# Altium PCB STM32 ONBOARD.PcbDoc (part 2 of 2)
Units mm, origin at the board's own origin, x right, y up, seen from the top; angles counter-clockwise.
Board outline 80.78 x 83.12 mm, 2 copper layers (Top Layer, Bottom Layer); 65 components, 57 nets, 280 pads, 99 vias.
Unrouted connection lines stored in the file: 49.
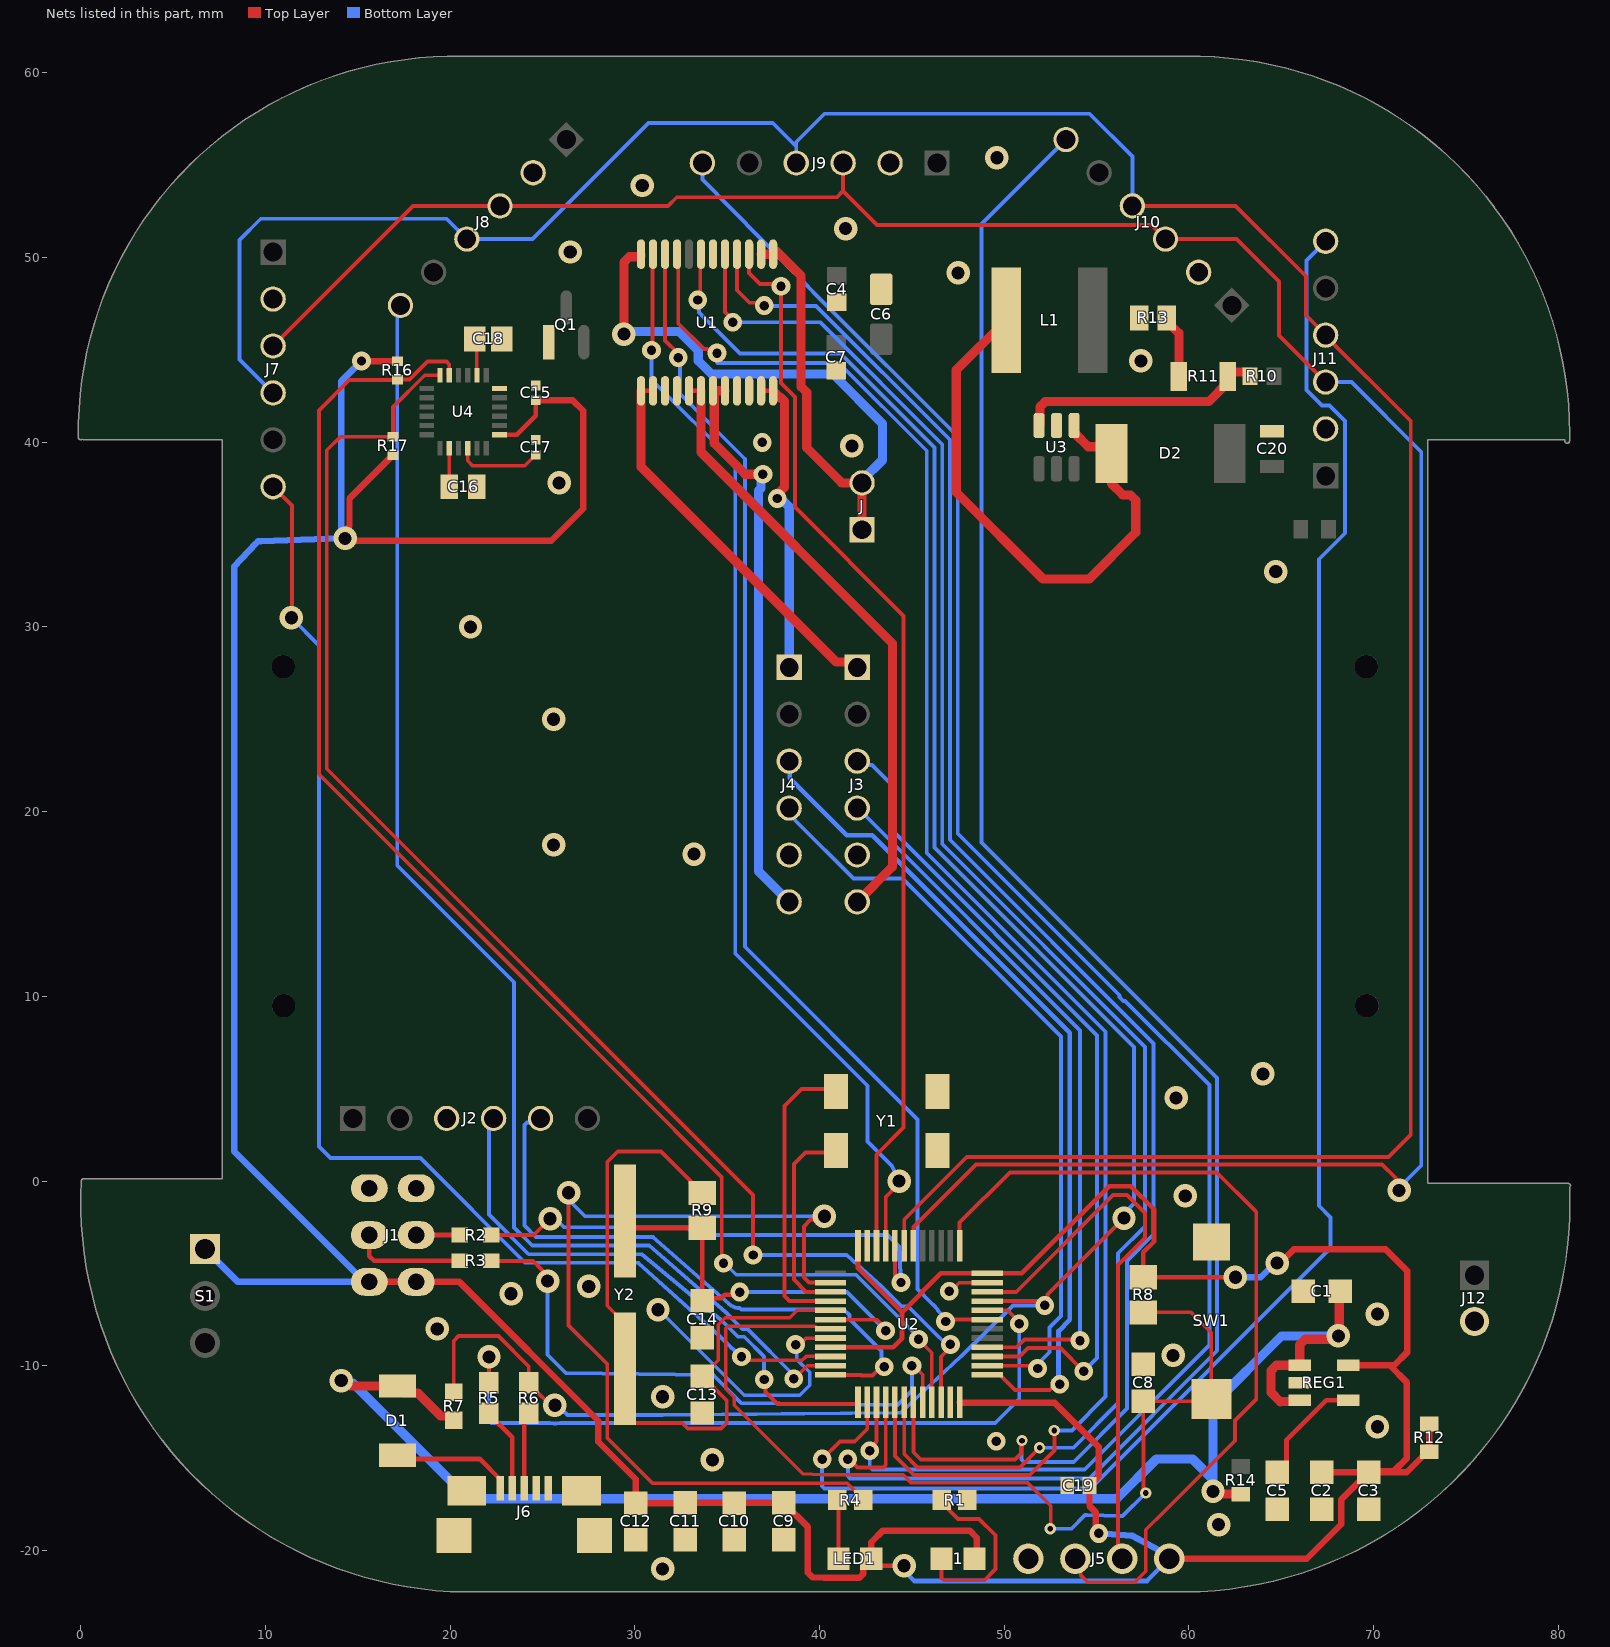
[diagram p2: the nets of this part, all layers, seen from the top]

## Via types
v1: diameter 1.27, hole 0.711, Top Layer to Bottom Layer, 57 vias
v2: diameter 1.016, hole 0.508, Top Layer to Bottom Layer, 37 vias
v3: diameter 0.61, hole 0.305, Top Layer to Bottom Layer, 5 vias

## Nets (pads, with @x,y where several pads share a name; then routed paths per layer and width w, separated by ;. In a path a pad name is that pad's centre, name@x,y a point inside that pad or via, vN(x,y) a via of type N, cw(c..) or ccw(c..) an arc to the next point about the centre after c; other vN are vias at no path point) (continued)
5V: C1.1 D1.K R7.1 R14.1 REG1.1 REG1.3 | length 82.6
  Top Layer w0.5: v1@14.603,-11.095 D1.K@17.145,-11.095 17.52,-11.47 18.246,-11.47 19.493,-12.717 19.968,-12.717 R7.1@20.193,-12.942 ; v1(61.3,-16.8) 61.442,-16.942 62.792,-16.942 R14.1@62.8,-16.95 ; REG1.3@65.94,-11.929 64.959,-11.929 64.943,-11.945 64.438,-11.44 64.438,-10.262 64.731,-9.969 REG1.1@66,-9.969 66,-8.859 66.293,-8.566 67.694,-8.566 67.879,-8.382 v1(68.087,-8.382) 68.135,-8.334 68.135,-6.017 C1.1@68.183,-5.969
  Bottom Layer w0.5: v1(14.1,-10.8) 14.247,-10.947 14.736,-10.947 20.989,-17.2 56.089,-17.2 58.239,-15.05 60.186,-15.05 61.3,-16.164 ; v1(61.3,-16.8) 61.3,-16.164 ; v1(68.087,-8.382) 65.018,-8.382 61.3,-12.1 61.3,-16.164
+3V3: 1.A C2.1 C3.1 C9.1 C10.1 C11.1 C12.1 C15.1 C19.1 J1.1 J1.2 J5.1 LED1.A R8.2 R12.1 R12.2 R16.2 R17.2 REG1.5 S1.1 U2.9 U2.24 U2.36 U2.48 U4.13 | length 264.5
  Top Layer w0.254: U4.13@22.671,40.406 23.602,40.406 24.638,41.442 C15.1@24.638,42.272 ; U2.9@40.593,-8.997 43.977,-8.997 44.463,-8.51 44.463,-8.19 44.465,-8.189 44.465,-7.097 ; U2.48@42.081,-3.509 42.081,-4.714 44.465,-7.097 ; LED1.A@42.799,-20.447 43.18,-20.828 v1(44.577,-20.828) ; R8.2@57.531,-5.207 v1(62.514,-5.207) ; R8.2@57.8,-4.953 57.531,-4.684 57.531,-3.862 58.105,-3.288 58.105,-1.538 56.843,-0.276 55.679,-0.276 50.958,-4.997 U2.36@49.069,-4.997 46.565,-4.997 44.465,-7.097
  Top Layer w0.35: v1@14.231,34.671 25.471,34.671 27.2,36.4 27.2,41.7 26.628,42.272 C15.1@24.638,42.272 ; v1(14.314,34.79) 14.49,34.966 14.49,35.396 14.549,35.455 14.549,36.949 16.775,39.175 16.775,39.225 16.85,39.3 R17.2@16.95,39.3 ; v2(15.2,44.4) 15.206,44.394 17.131,44.394 R16.2@17.137,44.387 R16.2@17.187,44.387 ; J1.2@15.621,-5.461 20.503,-5.461 28.015,-12.973 28.015,-14.108 30.054,-16.147 C12.1@30.054,-17.431 32.706,-17.431 C11.1@32.722,-17.415 35.373,-17.415 C10.1@35.388,-17.431 35.404,-17.415 C9.1@38.056,-17.415 39.37,-18.73 39.37,-21.209 39.624,-21.463 40.23,-21.463 40.243,-21.476 42.156,-21.476 42.374,-21.258 42.374,-20.872 LED1.A@42.799,-20.447 42.799,-19.558 ; 42.83,-19.527 43.434,-18.923 48.133,-18.923 48.514,-19.304 48.514,-20.32 1.A@48.387,-20.447 ; U2.24@47.581,-11.985 47.606,-12.01 52.736,-12.01 55.118,-14.392 55.118,-15.977 54.888,-16.207 54.812,-16.207 54.612,-16.407 54.612,-17.59 54.942,-17.919 54.942,-18.901 v2(55.118,-19.077) ; J5.1@58.928,-20.447 66.377,-20.447 68.247,-18.577 68.247,-17.24 C3.1@69.723,-15.764 ; v1(64.77,-4.445) 64.92,-4.445 65.665,-3.7 70.65,-3.7 71.805,-4.855 71.805,-9.281 71.116,-9.969 70.864,-9.969 ; C2.1@67.183,-15.764 C3.1@69.723,-15.764 ; REG1.5@68.62,-9.969 70.864,-9.969 ; R12.2@73,-13.15 R12.1@73,-14.65 72.9,-14.65 71.786,-15.764 C3.1@69.723,-15.764 ; C3.1@69.723,-15.764 69.787,-15.7 71.1,-15.7 71.8,-15 71.8,-10.905 70.864,-9.969
  Bottom Layer w0.254: v1(44.577,-20.828) 44.577,-21.103 45.127,-21.653 57.722,-21.653 J5.1@58.928,-20.447
  Bottom Layer w0.35: S1.1@6.731,-3.683 8.509,-5.461 J1.2@15.371,-5.461 ; v1(14.314,34.79) v1@14.112,34.79 ; v2(15.2,44.4) 14.112,43.312 v1@14.112,34.79 ; J1.2@15.621,-5.461 J1.2@15.371,-5.461 ; v2(55.118,-19.077) 56.907,-19.193 58.578,-20.097 J5.1@58.928,-20.447 ; v1(62.514,-5.207) 63.892,-5.207 64.654,-4.445 v1(64.77,-4.445) ; v1@14.112,34.79 9.734,34.642 9.596,34.638 9.494,34.536 8.3,33.258 8.3,1.61 J1.2@15.371,-5.461
AO1: J3.01 U1.1 U1.2 | length 21
  Top Layer w0.254: U1.1@30.334,42.782 U1.2@30.984,42.782
  Top Layer w0.5: U1.1@30.334,42.782 30.334,38.666 40.897,28.103 41.747,28.103 J3.01@42.037,27.813
AO2: J3.06 U1.5 U1.6 | length 33.4
  Top Layer w0.254: U1.5@32.934,42.782 U1.6@33.584,42.782
  Top Layer w0.5: U1.6@33.584,42.782 33.584,39.468 43.942,29.11 43.942,17.018 J3.06@42.037,15.113
BO1: J4.01 U1.11 U1.12 | length 16.4
  Top Layer w0.254: U1.11@36.834,42.782 U1.12@37.484,42.782
  Top Layer w0.5: U1.12@37.484,42.782 37.863,42.403 37.917,42.403 38.1,42.22 38.1,37.559 37.805,37.264 37.805,37.056 v2(37.706,36.957)
  Bottom Layer w0.5: v2(37.706,36.957) 38.1,36.749 38.354,36.495 J4.01@38.354,27.813
BO2: J4.06 U1.7 U1.8 | length 31.4
  Top Layer w0.254: U1.7@34.234,42.782 U1.8@34.884,42.782
  Top Layer w0.5: U1.8@34.884,42.782 34.294,42.782 34.294,39.944 35.968,38.27 v2(36.932,38.27)
  Bottom Layer w0.5: v2(36.932,38.27) 36.833,38.171 36.833,37.515 36.694,37.376 36.694,16.773 J4.06@38.354,15.113
BOOT0: R2.2 U2.44 | length 27.3
  Top Layer w0.21: R2.2@22.225,-2.921 24.527,-2.921 v1(25.409,-2.039) ; v1@25.061,-2.1 v1@25.271,-2.1 ; U2.44@44.081,-3.509 44.081,-5.163 44.408,-5.49 v2(44.41,-5.49)
  Bottom Layer w0.21: v1(25.409,-2.039) 25.696,-2.039 26.16,-2.503 32.827,-2.503 33.245,-2.921 43.675,-2.921 44.3,-3.546 v2(44.41,-5.49)
BOOT1: R3.2 U2.20 | length 32.5
  Top Layer w0.19: v2@45,-9.9 45.581,-10.481 U2.20@45.581,-11.985
  Top Layer w0.21: R3.2@22.225,-4.318 24.474,-4.318 24.58,-4.424 24.773,-4.617 24.773,-4.632 25.273,-5.132 v1(25.273,-5.419)
  Bottom Layer w0.21: v1(25.273,-5.419) 25.273,-9.401 26.204,-10.332 26.266,-10.394 34.171,-10.507 34.257,-10.508 34.317,-10.568 35.244,-11.495 35.701,-11.952 35.761,-12.012 44.127,-12.124 44.216,-12.124 45,-11.339 v2@45,-9.9
  other v2: 45,-10
GND: C1.2 C2.2 C3.2 C4.1 C5.1 C6.2 C7.1 C8.2 C9.2 C10.2 C11.2 C12.2 C13.1 C14.1 C15.2 C16.2 C17.2 C18.2 C19.2 C20.2 J1.5 J1.6 J2.03 J3.05 J4.05 J5.4 J6.4 J6.5 J6.6 J6.7 J6.8 J6.9 J7.02 J8.02 J9.02 J10.02 J11.02 J12.2 Q1.1 R1.2 R13.1 REG1.2 SW1.1 U1.3 U1.4 U1.9 U1.10 U1.18 U2.8 U2.23 U2.35 U2.47 U3.2 U4.18 Y1.2 Y1.3 | length 17.3
  Top Layer w0.19: v2(38.7,-8.854) 38.924,-8.854 39.28,-8.497 U2.8@40.593,-8.497 ; v2@46.922,-5.97 47.098,-5.97 47.571,-5.497 U2.35@49.069,-5.497
  Bottom Layer w0.19: v1(31.251,-6.97) 31.299,-6.97 35.931,-11.602 38.918,-11.602 39.458,-11.062 39.458,-10.352 38.753,-9.647 38.753,-8.907 v2(38.7,-8.854)
  other v1: 31.5,-21 61.6,-18.6 34.2,-15.1 70.2,-13.3 31.5,-11.677 59.136,-9.436 19.3,-8 70.2,-7.2 23.3,-6.1 27.5,-5.7 59.8,-0.8 59.3,4.5 64,5.8 33.2,17.7 25.6,18.2 25.6,25 21.1,30 64.7,33 25.9,37.8 41.753,39.8 57.4,44.4 47.498,49.167 26.5,50.3 41.412,51.57 30.4,53.9 49.6,55.4
  other v2: 49.56,-14.085 47.022,-5.97 36.9,39.991
Net1_K: 1.K R1.1 | length 9.6
  Top Layer w0.21: 1.K@46.609,-20.447 46.609,-21.489 46.732,-21.612 48.93,-21.612 49.53,-21.012 49.53,-19.177 48.641,-18.288 47.498,-18.288 R1.1@46.716,-17.506
NetC5_2: C5.2 REG1.4 | length 6.2
  Top Layer w0.254: C5.2@64.77,-15.764 65.278,-15.256 65.278,-14.022 67.426,-11.874 REG1.4@68.62,-11.874
NetC17_1: C17.1 U4.10 | length 4.7
  Top Layer w0.19: U4.10@20.951,39.686 20.951,38.993 21.209,38.735 24.041,38.735 C17.1@24.638,39.332
NetC18_1: C18.1 U4.20 | length 2
  Top Layer w0.19: C18.1@21.336,45.593 21.451,45.478 U4.20@21.451,43.626
NetD1_A: D1.A J6.1 | length 6.7
  Top Layer w0.254: D1.A@17.145,-14.545 17.643,-15.043 21.589,-15.043 22.703,-16.157 J6.1@22.703,-16.632
NetD2_2: D2.2 L1.1 U3.1 | length 30.9
  Top Layer w0.5: L1.1@50.101,46.609 47.4,43.908 47.4,37.3 52.1,32.6 54.6,32.6 57.12,35.12 57.12,36.857 56.827,37.15 56.41,37.15 55.8,37.76 55.8,39.15 55.19,39.76 54.54,39.76 53.83,40.47 53.827,40.47 53.782,40.515 U3.1@53.782,40.905
NetJ1_3: J1.3 R2.1 | length 2.5
  Top Layer w0.254: J1.3@18.161,-2.921 20.271,-2.921 R2.1@20.525,-3.175
NetJ1_4: J1.4 R3.1 | length 6.2
  Top Layer w0.254: J1.4@15.621,-2.921 15.621,-4.064 15.875,-4.318 R3.1@20.525,-4.318
NetJ6_2: J6.2 R5.2 | length 4.6
  Top Layer w0.254: R5.2@22.098,-12.573 22.098,-12.623 23.353,-13.878 J6.2@23.353,-16.632
NetJ6_3: J6.3 R6.2 | length 4.2
  Top Layer w0.254: J6.3@24.003,-16.632 24.003,-12.826 R6.2@24.257,-12.572
NetLED1_K: LED1.K R4.1 | length 3.2
  Top Layer w0.21: R4.1@40.956,-17.272 41.021,-17.337 LED1.K@41.021,-20.447
NetR10_1: R10.1 R11.2 U3.3 | length 13.7
  Top Layer w0.5: U3.3@51.882,40.905 51.927,40.95 51.927,41.907 52.22,42.2 61.067,42.2 62.103,43.236 R11.2@62.103,43.561 62.103,43.599 62.303,43.799 63.358,43.799 63.371,43.786 63.371,43.641 R10.1@63.451,43.561
NetR11_1: R11.1 R13.2 | length 3.4
  Top Layer w0.5: R13.2@58.801,46.736 58.801,46.561 59.453,45.909 R11.1@59.453,43.561
NRST: C8.1 R8.1 SW1.2 U2.7 | length 54
  Top Layer w0.19: 40.1,-15.908 39.094,-15.853 35.381,-12.14 35.381,-11.703 34.919,-11.241 34.919,-7.964 35.03,-7.853 39.749,-7.853 39.838,-7.942 40.538,-7.942 U2.7@40.593,-7.997 ; 40.1,-15.908 ccw(c40.146,-15.052) 40.146,-15.909 41.527,-15.91 ; 41.527,-15.91 44.53,-15.91 44.949,-16.329 51.259,-16.329 52.515,-17.586 52.515,-18.792 v3(52.484,-18.823) ; 57.531,-13.843 C8.1@57.531,-11.922 61.094,-11.922 SW1.2@61.214,-11.802 61.214,-8.214 60.107,-7.107 58.186,-7.107 R8.1@57.531,-7.107 ; R8.1@57.739,-6.58 58.186,-7.027 R8.1@58.186,-7.127
  Top Layer w0.21: 57.531,-13.843 57.531,-16.764 v3(57.658,-16.891)
  Bottom Layer w0.21: v3(52.484,-18.823) 53.634,-18.823 54.371,-18.086 54.461,-18.086 56.317,-18.142 56.407,-18.142 v3(57.658,-16.891)
OSCIN: C13.2 R9.1 U2.5 Y2.1 | length 39
  Top Layer w0.19: C13.2@33.655,-10.557 34.519,-9.693 34.519,-7.781 34.9,-7.4 38.382,-7.4 38.784,-6.998 40.592,-6.998 U2.5@40.593,-6.997
  Top Layer w0.21: C13.2@33.655,-10.557 34.971,-11.873 34.971,-13.092 34.663,-13.4 32.86,-13.4 32.563,-13.103 29.959,-13.103 29.464,-12.608 Y2.1@29.464,-10.16 29.464,-7.712 28.505,-6.753 28.505,1.037 29.073,1.605 31.41,1.605 33.01,0.005 33.01,-0.095 33.555,-0.64 R9.1@33.655,-0.64
OSCOUT: C14.2 R9.2 U2.6 Y2.2 | length 22.6
  Top Layer w0.19: U2.6@40.593,-7.497 43.096,-7.497 43.576,-7.977 v2(43.576,-8.108)
  Top Layer w0.254: Y2.2@29.464,-2.16 29.844,-2.54 R9.2@33.655,-2.54 C14.2@33.655,-6.477 33.782,-6.35 34.677,-6.35 34.87,-6.157 35.53,-6.157 v2(35.676,-6.011)
  Bottom Layer w0.21: v2(35.676,-6.011) 41.494,-6.011 43.576,-8.093 v2(43.576,-8.108)
PA0: J7.06 U2.10 | length 70.2
  Top Layer w0.19: v2(35.776,-9.51) 35.999,-9.51 36.2,-9.711 39.055,-9.711 39.269,-9.497 U2.10@40.593,-9.497
  Top Layer w0.21: J7.06@10.414,37.592 11.43,36.576 11.43,30.53 v1(11.4,30.5) ; v2(35.776,-9.51) 35.897,-9.65 v2@35.957,-9.711 ; U2.10@39.848,-9.542 U2.10@40.593,-9.497
  Bottom Layer w0.21: v1(11.4,30.5) 12.9,29 12.9,1.864 13.523,1.241 18.393,1.241 24.059,-4.425 30.187,-4.425 34.587,-8.39 34.591,-8.393 35.048,-8.85 35.171,-8.973 v2(35.776,-9.51)
PA1: J8.06 U2.11 | length 73.4
  Top Layer w0.19: v2(38.601,-10.707) 38.625,-10.707 39.335,-9.997 U2.11@40.593,-9.997
  Top Layer w0.21: v2(38.601,-10.707) v2@38.601,-10.699
  Bottom Layer w0.21: J8.06@17.309,47.408 17.137,47.236 17.137,17.08 23.451,10.767 23.451,-2.505 24.443,-3.497 30.781,-3.497 34.929,-7.126 35.814,-8.011 36.097,-8.011 38.601,-10.515 v2(38.601,-10.707)
PA2: J2.05 U2.12 | length 32.6
  Top Layer w0.21: U2.12@40.593,-10.497 42.237,-10.497 42.259,-10.519 42.855,-10.519 43.318,-10.056 v2(43.499,-10.056)
  Bottom Layer w0.21: J2.05@24.892,3.391 24.67,3.169 24.16,3.169 24.017,3.026 24.017,-2.415 24.635,-3.033 30.973,-3.033 35.104,-6.662 ccw(c35.676,-6.011) 35.676,-6.878 35.761,-6.963 41.289,-6.963 41.547,-7.175 41.615,-7.244 41.615,-7.477 43.346,-9.208 43.346,-9.902 v2(43.499,-10.056)
PA3: J2.04 U2.13 | length 30.5
  Top Layer w0.21: v2(37,-10.745) 37.072,-10.817 37.072,-11.418 37.719,-12.065 U2.13@42.072,-12.065
  Bottom Layer w0.21: J2.04@22.13,3.52 22.098,3.488 22.098,-1.808 24.251,-3.961 30.379,-3.961 34.655,-7.508 35.578,-8.431 35.923,-8.431 37,-9.508 v2(37,-10.745)
PA4: J11.06 U2.14 | length 95.9
  Top Layer w0.21: v2(40.146,-15.052) 41.101,-14.097 41.903,-14.097 42.581,-13.419 U2.14@42.581,-11.985
  Bottom Layer w0.21: v2(40.146,-15.052) 40.132,-15.066 40.132,-16.512 40.255,-16.635 54.665,-16.635 67.669,-3.631 67.669,-1.968 67.035,-1.334 67.035,33.663 68.444,35.072 68.444,41.152 67.606,41.99 67.194,41.99 66.356,42.828 66.356,49.836 J11.06@67.4,50.88
PA5: J9.06 U2.15 | length 100.3
  Top Layer w0.21: v2(42.714,-14.6) 42.9,-14.426 42.933,-14.394 43.081,-14.081 U2.15@43.081,-11.985
  Bottom Layer w0.21: J9.06@33.655,55.118 33.655,54.227 38.424,49.383 38.929,48.877 39.864,47.927 39.865,47.926 47.48,40.311 47.48,18.814 56.233,10.061 56.233,9.961 56.443,9.751 56.543,9.751 61.1,5.194 61.1,-8.877 54.357,-15.62 42.857,-15.62 42.714,-15.477 v2(42.714,-14.6)
PA6: J10.06 U2.16 | length 102.3
  Top Layer w0.21: v2(41.527,-15.053) 41.609,-15.053 42.055,-15.499 43.458,-15.499 43.581,-15.376 U2.16@43.581,-11.985
  Bottom Layer w0.21: v2(41.527,-15.053) 41.529,-15.054 41.529,-15.977 41.652,-16.1 54.606,-16.1 61.52,-9.186 61.52,5.58 48.768,18.332 48.768,51.816 J10.06@53.34,56.388
PA7: U1.21 U2.17 | length 92.3
  Top Layer w0.21: U1.21@32.33,49.738 32.33,49.391 32.35,49.371 32.35,46.429 33.739,45.04 33.92,45.04 33.979,44.982 34.292,44.982 v2(34.446,44.827) ; U2.17@44.081,-11.985 44.081,-14.881 45.119,-15.919 51.381,-15.919 52.711,-14.589 v3(52.711,-13.502)
  Bottom Layer w0.21: v2(34.446,44.827) 34.479,44.795 34.479,44.3 41.038,44.3 45.8,39.538 45.8,17.77 55.488,8.081 55.488,-11.674 53.66,-13.502 v3(52.711,-13.502)
PA10: U1.22 U2.31 | length 67
  Top Layer w0.21: U1.22@31.634,50.825 31.634,45.516 32.35,44.8 v2(32.35,44.582) ; v2(46.823,-7.601) 46.927,-7.497 U2.31@49.069,-7.497
  Bottom Layer w0.21: v2(32.35,44.582) 32.433,44.499 32.433,42.624 35.896,39.161 35.957,39.1 35.957,12.684 45.3,3.341 45.3,-5.847 46.042,-6.589 46.165,-6.712 46.4,-6.947 46.4,-7 46.823,-7.423 v2(46.823,-7.601)
PA11: R5.1 U2.32 | length 40.3
  Top Layer w0.21: R5.1@22.098,-10.923 22.102,-10.453 v1(22.102,-9.521) ; U2.32@49.069,-6.997 50.185,-6.997 50.808,-7.62 v2(50.808,-7.725)
  Bottom Layer w0.21: v1(22.102,-9.521) 22.098,-10.242 22.098,-12.968 22.221,-13.091 25.375,-13.091 25.497,-13.113 ccw(c25.671,-12.134) 25.845,-13.113 25.967,-13.091 49.509,-13.091 50.808,-11.792 v2(50.808,-7.725)
PA12: R6.1 R7.2 U1.19 U2.33 | length 114.5
  Top Layer w0.21: R7.2@20.193,-11.442 20.193,-8.651 20.447,-8.397 22.621,-8.397 24.257,-10.033 R6.1@24.257,-10.922 24.257,-10.972 24.923,-11.638 24.931,-11.638 25.427,-12.134 v1(25.671,-12.134) ; v2(33.4,47.7) 33.538,47.838 33.538,49.746 U1.19@33.584,49.792 ; U2.33@49.069,-6.497 51.743,-6.497 51.977,-6.731 v2(52.195,-6.731) ; v2@51.868,-6.622 52.086,-6.622 52.349,-6.359 52.349,-6.141 v1(56.482,-2.008)
  Bottom Layer w0.21: v1(25.671,-12.134) 26.237,-12.548 26.361,-12.671 31.509,-12.671 31.511,-12.671 44.307,-12.544 44.39,-12.544 47.673,-9.479 ccw(c47.081,-8.845) 47.689,-9.463 50.471,-6.731 v2(52.195,-6.731) ; v2(33.4,47.7) 33.472,47.628 33.472,47.028 35.7,44.8 41.131,44.8 46.22,39.711 46.22,18.068 57.023,7.265 57.023,-1.212 56.482,-1.753 v1(56.482,-2.008)
PB0: U1.17 U2.18 | length 91
  Top Layer w0.21: U1.17@34.884,50.058 34.884,47.06 35.3,46.644 v2(35.3,46.5) ; U2.18@44.581,-11.985 44.581,-14.781 45.299,-15.499 50.853,-15.499 v3(51.911,-14.441)
  Bottom Layer w0.21: v2(35.3,46.5) 40.025,46.5 46.64,39.885 46.64,18.242 57.619,7.263 57.619,-2.452 56.164,-3.907 56.164,-12.015 53.738,-14.441 v3(51.911,-14.441)
PB1: U1.16 U2.19 | length 92.2
  Top Layer w0.21: U1.16@35.534,50.358 35.534,48.228 36.208,47.554 36.846,47.554 v2(37,47.4) ; U2.19@45.081,-11.985 45.081,-14.681 45.479,-15.079 50.579,-15.079 50.91,-14.748 50.91,-14.097 v3(50.957,-14.05)
  Bottom Layer w0.21: v2(37,47.4) 37.014,47.386 39.811,47.386 47.06,40.137 47.06,18.478 58.083,7.455 58.083,-2.877 56.642,-4.318 56.642,-12.319 53.761,-15.2 51.056,-15.2 50.933,-15.077 50.933,-14.074 v3(50.957,-14.05)
PB6: J7.03 J8.03 J9.03 J10.03 J11.03 U2.42 | length 144.8
  Top Layer w0.21: J7.03@10.414,45.212 17.998,52.796 J8.03@22.697,52.796 31.8,52.796 32.269,53.265 40.946,53.265 41.275,53.594 ; J9.03@41.275,55.118 41.275,53.594 ; U2.42@45.081,-3.509 45.09,-2.764 45.09,-2.492 48.475,0.893 70.458,0.893 71.171,0.18 71.171,-0.305 v1(71.374,-0.508) ; J11.03@67.4,43.26 64.875,45.785 64.875,48.697 62.572,51 J10.03@58.728,51 57.976,51.752 43.117,51.752 41.275,53.594
  Bottom Layer w0.21: J11.03@67.4,43.26 68.788,43.26 72.574,39.474 72.574,0.837 71.374,-0.363 v1(71.374,-0.508)
PB7: J7.04 J8.04 J9.04 J10.04 J11.04 U2.43 | length 157.4
  Top Layer w0.21: U2.43@44.581,-3.509 44.581,-2.075 47.969,1.313 70.794,1.313 72.009,2.528 72.009,41.136 67.4,45.745 J11.04@67.4,45.8 66.327,46.873 66.327,48.989 62.52,52.796 J10.04@56.932,52.796
  Bottom Layer w0.21: J7.04@10.414,42.672 8.6,44.486 8.6,50.956 9.744,52.1 19.801,52.1 J8.04@20.901,51 24.457,51 30.734,57.277 37.465,57.277 38.735,56.007 ; J9.04@38.735,55.118 38.735,56.007 ; J10.04@56.932,52.796 56.932,55.463 54.61,57.785 40.259,57.785 38.735,56.261 38.735,56.007
PB8: U1.23 U2.45 | length 59.9
  Top Layer w0.21: v2(30.9,44.982) 30.946,45.029 U1.23@30.946,50.631 ; U2.45@43.581,-3.509 43.581,-1.885 43.581,-1.798 43.581,-0.869 44.306,-0.144 v1(44.306,0)
  Bottom Layer w0.21: v2(30.9,44.982) 30.909,44.973 30.909,43.386 35.432,38.863 35.432,12.32 42.589,5.163 42.589,2.148 43.776,0.961 43.899,0.838 v1(44.306,0)
PB9: U1.15 U2.46 | length 58.4
  Top Layer w0.21: U1.15@36.184,50.182 36.184,49.16 36.782,48.562 37.798,48.562 37.914,48.446 37.914,43.205 38.665,42.454 38.665,36.486 44.551,30.6 44.551,2.895 43.081,1.425 U2.46@43.081,-3.509
  other v2: 37.909,48.451
PB10: R16.1 U2.21 U4.23 | length 80.4
  Top Layer w0.19: v2(45.352,-8.559) 46.081,-9.287 U2.21@46.081,-11.985
  Top Layer w0.21: R16.1@17.137,43.362 14.533,43.362 12.9,41.729 12.9,22.025 24.13,10.795 24.13,10.793 29.573,5.35 34.7,0.223 v2@34.7,-4.486 ; R16.1@17.137,43.387 17.793,43.387 18.771,44.365 19.803,44.365 19.951,44.217 U4.23@19.951,43.626 19.916,43.661 U4.23@19.916,43.916
  Bottom Layer w0.19: v2(34.798,-4.445) 34.859,-4.445 35.493,-5.079 41.973,-5.079 44.866,-7.972 45.352,-8.52 v2(45.352,-8.559)
PB11: R17.1 U2.22 U4.24 | length 77.8
  Top Layer w0.21: U4.24@19.416,43.626 18.626,43.626 16.9,41.9 R17.1@16.9,40.3 14.052,40.3 13.32,39.568 13.32,22.323 36.4,-0.757 v2(36.4,-4) ; U2.22@46.581,-11.985 46.581,-9.509 47.081,-9.008 v2(47.081,-8.845)
  Bottom Layer w0.19: 44.429,-6.778 44.784,-6.778 46.464,-8.458 46.471,-8.458 46.858,-8.845 v2(47.081,-8.845)
  Bottom Layer w0.21: v2(36.4,-4) 41.474,-4 43.349,-5.699 44.429,-6.778
PB12: J4.03 U2.25 | length 45.5
  Top Layer w0.21: U2.25@49.069,-10.497 49.769,-10.497 50.59,-11.318 52.464,-11.318 52.782,-11 v2(53,-11)
  Bottom Layer w0.254: J4.03@38.354,22.733 38.382,22.705 38.382,21.816 40.394,19.804 41.479,18.719 42.851,18.719 53.548,8.022 53.548,-7.511 52.939,-8.12 52.939,-10.939 v2(53,-11)
PB13: J4.04 U2.26 | length 41.3
  Top Layer w0.21: U2.26@49.069,-9.997 51.653,-9.997 v2(51.802,-10.146)
  Bottom Layer w0.21: J4.04@38.354,20.193 38.354,19.879 38.684,19.549 38.684,19.529 41.831,16.383 44.5,16.383 53.062,7.821 53.062,-7.31 52.453,-7.919 52.453,-9.269 51.802,-9.92 v2(51.802,-10.146)
PB14: J3.03 U2.27 | length 45
  Top Layer w0.21: U2.27@49.069,-9.497 50.819,-9.497 51.111,-9.205 51.116,-9.205 51.282,-9.039 53.039,-9.039 v2(54.3,-10.3)
  Bottom Layer w0.21: J3.03@42.037,22.733 42.237,22.533 42.831,22.533 43.942,21.422 43.942,18.971 55.024,7.889 55.024,-9.576 v2(54.3,-10.3)
PB15: J3.04 U2.28 | length 39.1
  Top Layer w0.21: U2.28@49.069,-8.997 50.663,-8.997 51.085,-8.575 54.041,-8.575 v2(54.102,-8.636)
  Bottom Layer w0.21: J3.04@42.037,20.193 42.064,20.193 54.102,8.155 v2(54.102,-8.636)
PC13: R4.2 U2.2 | length 49.6
  Top Layer w0.21: v1(26.416,-0.635) 26.416,-7.816 28.505,-9.905 28.505,-13.905 30.963,-16.363 41.497,-16.363 42.356,-17.222 R4.2@42.356,-17.272 ; v1@40.005,-1.905 39.822,-2.088 39.518,-2.088 39.148,-2.458 39.148,-5.218 39.427,-5.497 U2.2@40.593,-5.497
  Bottom Layer w0.21: v1@26.035,-0.635 27.305,-1.905 v1(40.259,-1.905)
PC14: U2.3 Y1.1 | length 11.2
  Top Layer w0.21: U2.3@40.593,-5.997 39.271,-5.997 38.608,-5.334 38.608,0.914 39.243,1.549 40.665,1.549 Y1.1@40.894,1.778
PC15: U2.4 Y1.4 | length 16.1
  Top Layer w0.21: U2.4@40.593,-6.497 38.374,-6.497 38.1,-6.223 38.1,4.064 39.014,4.978 Y1.4@40.894,4.978
SWCLK: J5.3 U2.37 | length 46.2
  Top Layer w0.19: J5.3@53.848,-20.447 54.127,-20.726 54.127,-21.328 54.516,-21.717 57.062,-21.717 57.657,-21.122 57.657,-18.885 58.252,-18.29
  Top Layer w0.21: U2.37@47.581,-3.509 47.581,-2.245 50.299,0.473 61.503,0.473 63.576,-1.6 63.638,-1.662 63.638,-11.818 62.485,-12.971 62.485,-14.057 58.252,-18.29
SWDIO: J5.2 U2.34 | length 30.5
  Top Layer w0.21: U2.34@49.069,-5.997 50.645,-5.997 55.88,-0.762 56.642,-0.762 57.619,-1.739 57.619,-3.087 56.164,-4.542 56.164,-20.223 J5.2@56.388,-20.447
V5: J.1 J.2 U1.13 U1.14 U1.24 | length 43.5
  Top Layer w0.5: v1(29.409,45.859) 29.409,49.747 29.702,50.04 30.309,50.04 30.334,50.065 U1.24@30.334,50.182 ; U1.14@36.834,50.182 U1.13@37.484,50.182 ; U1.13@37.657,50.355 39,49.011 39,43 39.3,42.7 39.3,39.7 41.2,37.8 J.2@42.3,37.8 J.1@42.3,35.26
  Bottom Layer w0.5: v1(29.409,45.859) 29.544,45.994 32.406,45.994 33.434,44.966 33.434,44.408 34.143,43.7 40.713,43.7 43.406,41.007 43.406,39.042 42.3,37.936 J.2@42.3,37.8
VLOGIC: C16.1 U4.8 | length 2.1
  Top Layer w0.19: C16.1@19.951,37.592 U4.8@19.951,39.686
pads on no net: J2.01 J2.06 J7.05 J8.05 J9.05 J10.05 J11.05 Q1.3 S1.3 U2.1 U2.29 U2.30 U2.38 U2.39 U2.40 U2.41 U3.4 U3.6 U4.1 U4.2 U4.3 U4.4 U4.5 U4.6 U4.7 U4.9 U4.11 U4.12 U4.14 U4.15 U4.16 U4.17 U4.19 U4.21 U4.22
copper on no net: | length 0
  Top Layer w0.254: 69.606,27.85 69.629,27.827

## Polygon pours and split planes (outlines as drawn)
GND on Top Layer "GND_L01_P001" (solid, pour order 1): 7.777,40.259 7.776,40.259 0,40.259 0,41.586 0.112,43.404 0.323,44.231 0.375,44.465 0.637,45.629 0.648,45.661 0.8,46.132 0.841,46.423 1.036,47.036 1.285,47.654 1.398,47.934 1.516,48.316 2.03,49.405 2.491,50.296 3.298,51.639 3.72,52.258 3.908,52.508 4.599,53.407 5.075,53.964 6.292,55.181 7.453,56.261 8.163,56.763 9.8,57.8 10.905,58.5 12.74,59.34 12.74,59.341 15.909,60.437 17.875,60.762 18.538,60.825 18.559,60.827 19.201,60.879 60.941,60.88 61.271,60.879 62.528,60.632 62.528,60.572 63.247,60.535 65.1,60.1 65.867,59.976 66.583,59.751 67.172,59.53 67.954,59.225 68.52,58.994 69.206,58.663 69.304,58.607 69.787,58.352 70.13,58.168 71.003,57.7 71.521,57.183 71.613,57.258 72.24,56.805 72.956,56.261 73.376,55.902 74.266,55.095 74.762,54.598 76.067,53.15 76.947,51.924 77.9,50.2 78.766,48.634 79.5,46.6 80,44.907 80.151,44.127 80.3,43.064 80.3,42.9 80.3,40.18 80.223,40.257 72.802,40.257 72.801,40.256 72.801,-0.253 80.476,-0.253 80.48,-0.258 80.48,-3.42 80.349,-3.851 80.3,-4.384 80.205,-5.095 80,-5.784 79.616,-7.254 79.443,-7.915 79.176,-8.624 78.875,-9.325 78.766,-9.579 78.611,-9.92 78.58,-9.92 78.099,-10.89 77.826,-11.465 77.233,-12.39 76.913,-12.943 76.655,-13.29 75.572,-14.749 75.161,-15.186 75.135,-15.186 73.34,-16.982 72.8,-17.442 72.347,-17.795 70.983,-18.759 70.603,-19 69.479,-19.648 67.7,-20.5 66.303,-21.055 65.3,-21.3 63.288,-21.792 62.217,-21.983 19.302,-21.983 19.243,-22.042 18.538,-21.983 16.4,-21.6 14.982,-21.218 13,-20.5 11.005,-19.505 10.1,-19 8.603,-17.903 7.9,-17.2 5.923,-15.606 3.369,-12.269 2.128,-10.064 1.21,-7.774 0.157,-3.283 0.157,0 7.777,0
GND on Bottom Layer "GND_L02_P003" (solid, pour order 3): 19.285,60.835 61.352,60.835 62.301,60.687 63.514,60.356 63.606,60.448 65.184,60.056 66.933,59.707 68.947,58.785 70.273,58.168 71.326,57.377 71.716,56.988 72.331,56.761 74.484,54.834 74.598,54.834 74.767,54.556 76.184,53.139 76.655,52.493 76.655,52.256 77.184,51.727 78.211,49.923 78.884,48.59 79.444,47.196 80.084,44.834 80.477,42.595 80.307,40.214 80.306,40.212 72.885,40.212 72.885,-0.297 80.602,-0.297 80.602,-2.552 80.669,-2.619 80.433,-2.855 80.433,-4.195 80.306,-5.138 79.784,-6.455 79.892,-6.563 79.784,-7.393 79.26,-8.668 79.16,-8.668 78.664,-9.964 78.047,-11.381 76.812,-13.259 76.061,-14.264 74.159,-16.166 74.159,-16.353 73.229,-17.283 72.331,-17.994 71.749,-18.321 71.034,-18.753 69.947,-19.395 69.947,-19.481 68.947,-20.15 67.784,-20.444 67.784,-20.544 66.933,-20.895 65.869,-21.344 64.137,-21.755 63.097,-21.931 62.397,-21.931 62.301,-22.027 18.267,-22.027 16.458,-21.755 13.451,-20.644 13.424,-20.671 10.12,-19.148 8.016,-17.276 3.999,-13.259 2.3,-10.582 1.172,-7.443 1.184,-7.431 0.241,-3.731 0.211,-1.195 0.241,-1.165 0.241,-0.044 7.861,-0.044 7.86,-0.044 7.86,40.215 0.33,40.215 0.084,40.461 0.14,40.517 0.14,43.112 0.316,43.572 0.33,43.756 0.415,44.834 0.732,45.617 1.022,46.685 1.55,48.322 2.3,49.807 3.487,51.942 7.264,55.973 9.321,57.494 14.385,59.894 15.645,60.315 16.352,60.467 17.715,60.687 19.285,60.835

## Silkscreen, mask and mechanical layers (free items; w line width, h text height)
Mechanical 1:
  lines w0.254: 0,40.259 cw(c20.186,40.576) 19.868,60.762 20.024,60.762 ; 0.157,40.259 7.777,40.259 7.777,0 0.157,0 ccw(c21.14,-1.115) 20.025,-22.098 60.609,-22.098 ccw(c59.62,-1.242) 80.477,-0.254 ; 19.898,-21.971 20.025,-21.844 ; 20.025,60.762 60.611,60.76 cw(c60.201,40.486) 80.475,40.077 80.477,40.075 ; 72.789,-0.253 80.518,-0.253 ; 72.801,-0.254 72.801,40.256 72.802,40.257 80.479,40.257

## Text inside footprints (layer, text, board x,y; h text height)
1: Top Overlay "K" at 44.773,-20.697 h0.56; Top Overlay "A" at 49.485,-20.622 h0.51
LED1: Top Overlay "K" at 39.185,-20.697 h0.56; Top Overlay "A" at 43.897,-20.622 h0.51